# Altium PCB photo_frame-v1.0.PcbDoc (part 3 of 5)
Units mil, origin at the board's own origin, x right, y up, seen from the top; angles counter-clockwise.
Board outline 27716.54 x 14566.93 mil, 2 copper layers (Top Layer, Bottom Layer), stack 61.811 mil thick; 261 components, 231 nets, 1061 pads, 959 vias.
Unrouted connection lines stored in the file: 10.
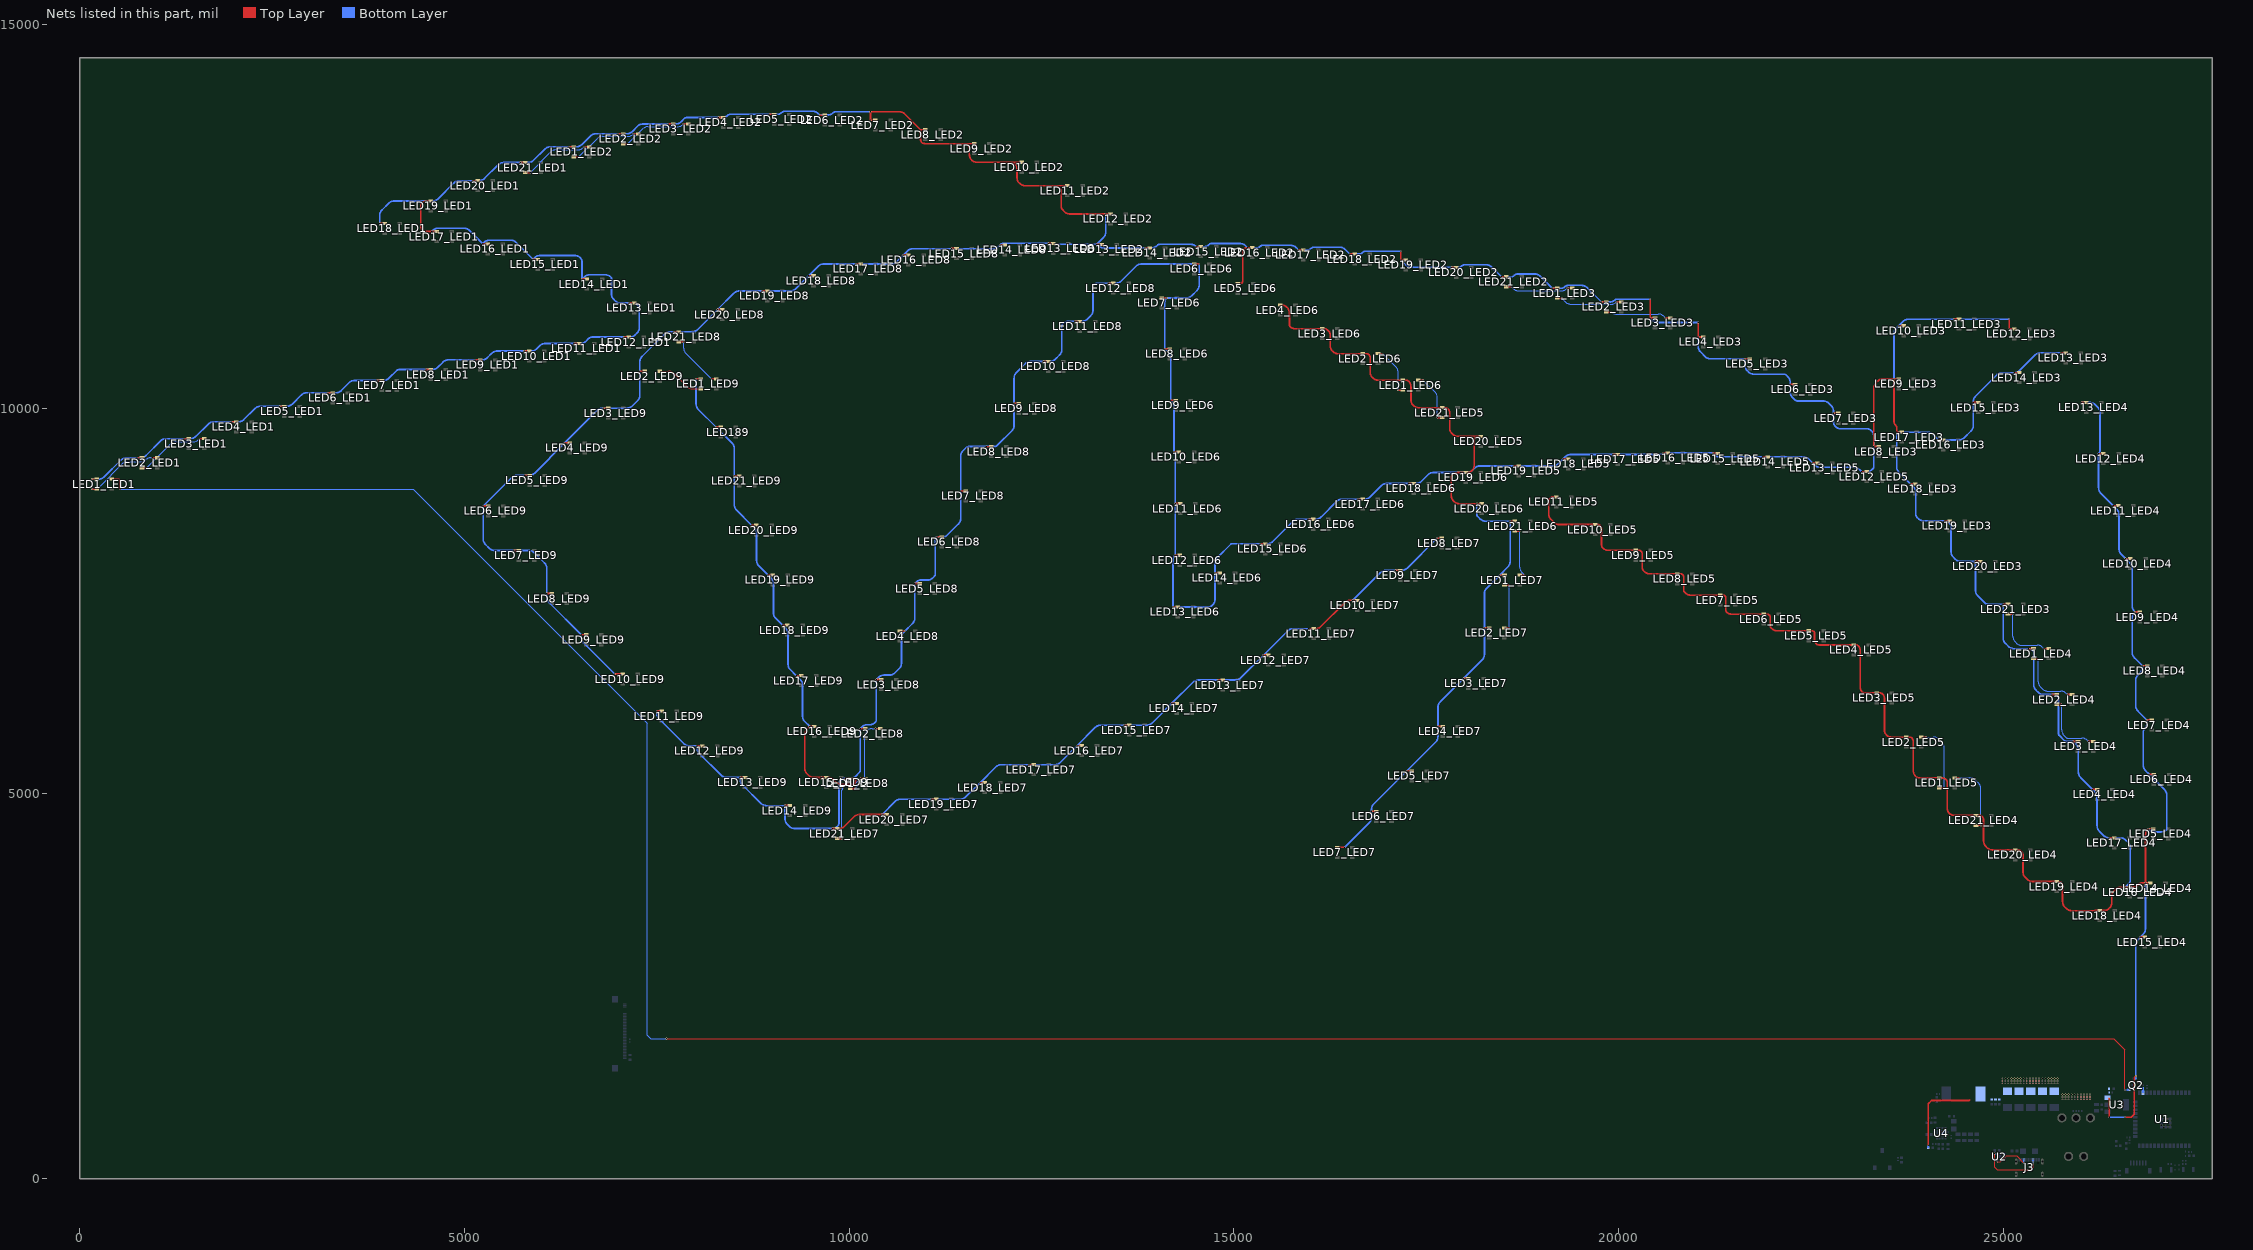
[diagram p2: the nets of this part, all layers, seen from the top]

## Via types
v1: diameter 23.62, hole 11.81, Top Layer to Bottom Layer, tented both sides, 729 vias
v2: diameter 23.62, hole 11.81, Top Layer to Bottom Layer, 230 vias

## Nets (pads, with @x,y where several pads share a name; then routed paths per layer and width w, separated by ;. In a path a pad name is that pad's centre, name@x,y a point inside that pad or via, vN(x,y) a via of type N, cw(c..) or ccw(c..) an arc to the next point about the centre after c; other vN are vias at no path point) (continued)
5V: C9.2 C10.2 C20.1 C21.1 C22.1 C23.1 C24.1 C25.2 C26.2 C27.2 L1.2 LED1_LED1.1 LED1_LED2.1 LED1_LED3.1 LED1_LED4.1 LED1_LED5.1 LED1_LED6.1 LED1_LED7.1 LED1_LED8.1 LED1_LED9.1 LED2_LED1.1 LED2_LED2.1 LED2_LED3.1 LED2_LED4.1 LED2_LED5.1 LED2_LED6.1 LED2_LED7.1 LED2_LED8.1 LED2_LED9.1 LED3_LED1.1 LED3_LED2.1 LED3_LED3.1 LED3_LED4.1 LED3_LED5.1 LED3_LED6.1 LED3_LED7.1 LED3_LED8.1 LED3_LED9.1 LED4_LED1.1 LED4_LED2.1 LED4_LED3.1 LED4_LED4.1 LED4_LED5.1 LED4_LED6.1 LED4_LED7.1 LED4_LED8.1 LED4_LED9.1 LED5_LED1.1 LED5_LED2.1 LED5_LED3.1 LED5_LED4.1 LED5_LED5.1 LED5_LED6.1 LED5_LED7.1 LED5_LED8.1 LED5_LED9.1 LED6_LED1.1 LED6_LED2.1 LED6_LED3.1 LED6_LED4.1 LED6_LED5.1 LED6_LED6.1 LED6_LED7.1 LED6_LED8.1 LED6_LED9.1 LED7_LED1.1 LED7_LED2.1 LED7_LED3.1 LED7_LED4.1 LED7_LED5.1 LED7_LED6.1 LED7_LED7.1 LED7_LED8.1 LED7_LED9.1 LED8_LED1.1 LED8_LED2.1 LED8_LED3.1 LED8_LED4.1 LED8_LED5.1 LED8_LED6.1 LED8_LED7.1 LED8_LED8.1 LED8_LED9.1 LED9_LED1.1 LED9_LED2.1 LED9_LED3.1 LED9_LED4.1 LED9_LED5.1 LED9_LED6.1 LED9_LED7.1 LED9_LED8.1 LED9_LED9.1 LED10_LED1.1 LED10_LED2.1 LED10_LED3.1 LED10_LED4.1 LED10_LED5.1 LED10_LED6.1 LED10_LED7.1 LED10_LED8.1 LED10_LED9.1 LED11_LED1.1 LED11_LED2.1 LED11_LED3.1 LED11_LED4.1 LED11_LED5.1 LED11_LED6.1 LED11_LED7.1 LED11_LED8.1 LED11_LED9.1 LED12_LED1.1 LED12_LED2.1 LED12_LED3.1 LED12_LED4.1 LED12_LED5.1 LED12_LED6.1 LED12_LED7.1 LED12_LED8.1 LED12_LED9.1 LED13_LED1.1 LED13_LED2.1 LED13_LED3.1 LED13_LED4.1 LED13_LED5.1 LED13_LED6.1 LED13_LED7.1 LED13_LED8.1 LED13_LED9.1 LED14_LED1.1 LED14_LED2.1 LED14_LED3.1 LED14_LED4.1 LED14_LED5.1 LED14_LED6.1 LED14_LED7.1 LED14_LED8.1 LED14_LED9.1 LED15_LED1.1 LED15_LED2.1 LED15_LED3.1 LED15_LED4.1 LED15_LED5.1 LED15_LED6.1 LED15_LED7.1 LED15_LED8.1 LED15_LED9.1 LED16_LED1.1 LED16_LED2.1 LED16_LED3.1 LED16_LED4.1 LED16_LED5.1 LED16_LED6.1 LED16_LED7.1 LED16_LED8.1 LED16_LED9.1 LED17_LED1.1 LED17_LED2.1 LED17_LED3.1 LED17_LED4.1 LED17_LED5.1 LED17_LED6.1 LED17_LED7.1 LED17_LED8.1 LED17_LED9.1 LED18_LED1.1 LED18_LED2.1 LED18_LED3.1 LED18_LED4.1 LED18_LED5.1 LED18_LED6.1 LED18_LED7.1 LED18_LED8.1 LED18_LED9.1 LED19_LED1.1 LED19_LED2.1 LED19_LED3.1 LED19_LED4.1 LED19_LED5.1 LED19_LED6.1 LED19_LED7.1 LED19_LED8.1 LED19_LED9.1 LED20_LED1.1 LED20_LED2.1 LED20_LED3.1 LED20_LED4.1 LED20_LED5.1 LED20_LED6.1 LED20_LED7.1 LED20_LED8.1 LED20_LED9.1 LED21_LED1.1 LED21_LED2.1 LED21_LED3.1 LED21_LED4.1 LED21_LED5.1 LED21_LED6.1 LED21_LED7.1 LED21_LED8.1 LED21_LED9.1 LED189.1 R6.2 R14.2 U3.3 U4.24 | length 155545.7
  Top Layer w22: v1@161.12,9088.39 LED1_LED1.1@223.94,9088.39 ; v1@748.87,9366.22 LED2_LED1.1@811.69,9366.22 ; v1@1358.08,9614.28 LED3_LED1.1@1420.9,9614.28 ; v1@1975.87,9833.22 LED4_LED1.1@2038.69,9833.22 ; v1@2599.87,10034.22 LED5_LED1.1@2662.69,10034.22 ; v1@3226.87,10210.22 LED6_LED1.1@3289.69,10210.22 ; v1@3864.87,10370.22 LED7_LED1.1@3927.69,10370.22 ; v1@3900.54,12412.97 LED18_LED1.1@3963.36,12412.97 ; v1@4499.87,10512.22 LED8_LED1.1@4562.69,10512.22 ; LED19_LED1.1@4564.68,12703.19 4564.62,12703.13 4501.92,12703.13 v1(4501.86,12703.07) ccw(c4501.86,12635.99) 4454.43,12683.43 4453,12682 ccw(c4496.46,12638.54) 4435,12638.54 4435,12374.11 ccw(c4510.11,12374.11) 4457,12321 ccw(c4493.92,12357.92) 4493.92,12305.71 v1(4577.02,12305.71) ; v1@4577.02,12305.84 LED17_LED1.1@4639.84,12305.84 ; v1@5112.15,12966.98 LED20_LED1.1@5174.97,12966.98 ; v1@5142.42,10638.9 LED9_LED1.1@5205.24,10638.9 ; v1@5238.98,12146.73 LED16_LED1.1@5301.8,12146.73 ; v1@5245.87,8740.22 LED6_LED9.1@5308.69,8740.22 ; v1@5646.87,8161.22 LED7_LED9.1@5709.69,8161.22 ; v1@5730.87,13202.22 LED21_LED1.1@5793.69,13202.22 ; v1@5781.87,10753.22 LED10_LED1.1@5844.69,10753.22 ; v1@5785.87,9137.22 LED5_LED9.1@5848.69,9137.22 ; v1@5892.26,11944.12 LED15_LED1.1@5955.08,11944.12 ; v1@6071.87,7602.22 LED8_LED9.1@6134.69,7602.22 ; v1@6305.87,9559.22 LED4_LED9.1@6368.69,9559.22 ; v1@6361.87,13406.22 LED1_LED2.1@6424.69,13406.22 ; v1@6427.87,10851.22 LED11_LED1.1@6490.69,10851.22 ; v1@6519.87,7066.22 LED9_LED9.1@6582.69,7066.22 ; v1@6530,11687.93 LED14_LED1.1@6592.82,11687.93 ; v1@6806.87,10011.22 LED3_LED9.1@6869.69,10011.22 ; v1(6954.08,6555.22) LED10_LED9.1@7057.69,6555.22 ; v1@7000.87,13575.22 LED2_LED2.1@7063.69,13575.22 ; v1(7074.17,10935.07) LED12_LED1.1@7136.96,10935.04 ; v1@7144.52,11377.91 LED13_LED1.1@7207.34,11377.91 ; v1@7279.87,10490.22 LED2_LED9.1@7342.69,10490.22 ; v1@7500.87,6074.22 LED11_LED9.1@7563.69,6074.22 ; v1@7650.87,13703.22 LED3_LED2.1@7713.69,13703.22 ; v1@7723.87,11002.22 LED21_LED8.1@7786.69,11002.22 ; v1@8011.87,10391.22 LED1_LED9.1@8074.69,10391.22 ; v1@8026.87,5623.22 LED12_LED9.1@8089.69,5623.22 ; v1@8269.87,9765.22 LED189.1@8332.69,9765.22 ; v1@8290.87,11292.22 LED20_LED8.1@8353.69,11292.22 ; v1@8302.87,13788.22 LED4_LED2.1@8365.69,13788.22 ; v1@8508.87,9131.22 LED21_LED9.1@8571.69,9131.22 ; v1@8584.87,5212.22 LED13_LED9.1@8647.69,5212.22 ; v1@8732.87,8490.22 LED20_LED9.1@8795.69,8490.22 ; v1@8873.87,11533.22 LED19_LED8.1@8936.69,11533.22 ; v1@8943.87,7844.22 LED19_LED9.1@9006.69,7844.22 ; v1@8961.87,13829.22 LED5_LED2.1@9024.69,13829.22 ; v1@9135.87,7190.22 LED18_LED9.1@9198.69,7190.22 ; v1@9167.87,4846.22 LED14_LED9.1@9230.69,4846.22 ; v1@9315.45,6534.26 LED17_LED9.1@9378.27,6534.26 ; v1@9474.87,11731.22 LED18_LED8.1@9537.69,11731.22 ; v1(9487.16,5875.77) 9453.29,5841.9 ccw(c9524,5771.19) 9424,5771.19 9424,5331.42 ccw(c9524,5331.42) 9453.29,5260.71 9473.12,5240.88 ccw(c9543.83,5311.59) 9543.83,5211.59 v1(9638.53,5211.59) ; v1@9487.16,5875.91 LED16_LED9.1@9549.98,5875.91 ; v1(9619.87,13820.07) 9620.31,13820.07 9622.16,13818.22 LED6_LED2.1@9682.69,13818.22 ; v1@9638.53,5211.73 LED15_LED9.1@9701.35,5211.73 9731.37,5211.73 cw(c9731.37,5119.3) 9796.73,5184.66 9830.09,5151.29 ccw(c9900.81,5222) 9900.81,5122 10046.86,5122 ccw(c10046.86,5156.14) 10071,5132 10073.81,5134.81 ccw(c10051.62,5157) 10083,5157 10083,5172.1 ccw(c10059.1,5172.1) 10076,5189 ccw(c10051.33,5164.33) 10051.33,5199.22 LED1_LED8.1@10015.69,5199.22 v1@9952.87,5199.22 ; v1@9782.07,4548.53 LED21_LED7.1@9844.89,4548.53 9870.1,4548.53 ccw(c9870.1,4648.53) 9940.81,4577.81 10063.8,4700.8 cw(c10134.51,4630.09) 10134.51,4730.09 v1(10428.87,4730.09) ; v1@10088.87,11884.22 LED17_LED8.1@10151.69,11884.22 ; v1@10145.87,5846.22 LED2_LED8.1@10208.69,5846.22 ; v1(10278.87,13753.09) v1@10278.87,13753.22 ; LED7_LED2.1@10341.69,13753.22 v1@10278.87,13753.22 ; v1@10354.87,6484.22 LED3_LED8.1@10417.69,6484.22 ; v1@10428.87,4730.22 LED20_LED7.1@10491.69,4730.22 ; LED4_LED8.1@10661.69,7113.22 v1@10724.51,7113.22 ; v1@10708.3,12002.18 LED16_LED8.1@10771.12,12002.18 ; v1@10853.87,7731.22 LED5_LED8.1@10916.69,7731.22 ; 10927.22,13630.22 LED8_LED2.1@10991.69,13630.22 ; v1@11068.87,4930.22 LED19_LED7.1@11131.69,4930.22 ; v1@11140.87,8339.22 LED6_LED8.1@11203.69,8339.22 ; v1@11332.87,12084.22 LED15_LED8.1@11395.69,12084.22 ; v1@11450.87,8934.22 LED7_LED8.1@11513.69,8934.22 ; 11563,13295 11563,13370.67 ccw(c11463,13370.67) 11533.71,13441.38 11527,13448.09 ; 11563.87,13304.55 ccw(c11663.87,13304.55) 11593.16,13233.84 11594,13233 ccw(c11658.97,13297.97) 11658.97,13206.09 12134,13206.09 ; 11563.87,13448.09 11527,13448.09 ; 11563.87,13448.22 LED9_LED2.1@11626.69,13448.22 ; v1@11702.87,5144.22 LED18_LED7.1@11765.69,5144.22 ; v1@11782.87,9511.22 LED8_LED8.1@11845.69,9511.22 ; v1@11960.87,12133.22 LED14_LED8.1@12023.69,12133.22 ; v1@12143.87,10074.22 LED9_LED8.1@12206.69,10074.22 ; 12181.87,13206.09 12134,13206.09 ; 12181.87,13206.22 LED10_LED2.1@12244.69,13206.22 ; v1@12335.87,5377.22 LED17_LED7.1@12398.69,5377.22 ; v1@12524.87,10617.22 LED10_LED8.1@12587.69,10617.22 ; v1@12590.45,12152.26 LED13_LED8.1@12653.27,12152.26 ; 12774.87,12902.09 12704,12902.09 ; 12774.87,12902.22 LED11_LED2.1@12837.69,12902.22 ; v1@12936.87,11138.22 LED11_LED8.1@12999.69,11138.22 ; v1@12961.87,5624.22 LED16_LED7.1@13024.69,5624.22 ; v1@13218.87,12139.22 LED13_LED2.1@13281.69,12139.22 ; v1(13333.87,12534.09) 12869.33,12534.09 cw(c12869.33,12634.09) 12798.62,12563.38 12775,12587 cw(c12816.04,12628.04) 12758,12628.04 12758,12825 ccw(c12702.26,12825) 12741.68,12864.41 12704,12902.09 ; v1@13333.87,12534.22 LED12_LED2.1@13396.69,12534.22 ; v1@13371.87,11634.22 LED12_LED8.1@13434.69,11634.22 ; v1@13579.87,5892.22 LED15_LED7.1@13642.69,5892.22 ; v1@13845.45,12093.18 LED14_LED2.1@13908.27,12093.18 ; LED7_LED6.1@14062.91,11442.37 v1@14125.73,11442.37 ; v1@14103.87,10780.22 LED8_LED6.1@14166.69,10780.22 ; v1@14179.45,10113.18 LED9_LED6.1@14242.27,10113.18 ; v1@14194.87,6174.22 LED14_LED7.1@14257.69,6174.22 ; v1@14209.87,7428.22 LED13_LED6.1@14272.69,7428.22 ; v1@14222.87,9443.22 LED10_LED6.1@14285.69,9443.22 ; v1@14233.45,8099.26 LED12_LED6.1@14296.27,8099.26 ; v1@14239.87,8771.22 LED11_LED6.1@14302.69,8771.22 ; LED6_LED6.1@14486.82,11884.4 v1@14549.64,11884.4 ; v1@14509.84,12108.72 LED15_LED2.1@14572.66,12108.72 ; v1@14754.87,7869.22 LED14_LED6.1@14817.69,7869.22 ; v1@14794.3,6478.18 LED13_LED7.1@14857.12,6478.18 ; LED5_LED6.1@15053.08,11632.48 15101.67,11632.48 ccw(c15069.5,11664.66) 15115,11664.66 15115,12055.51 cw(c15135.49,12055.51) 15121,12070 15126.24,12075.24 cw(c15176.58,12024.91) v1(15176.58,12096.09) ; v1@15176.58,12096.23 LED16_LED2.1@15239.4,12096.23 ; v1@15344.87,8248.22 LED15_LED6.1@15407.69,8248.22 ; v1@15385.87,6802.22 LED12_LED7.1@15448.69,6802.22 ; LED4_LED6.1@15604,11349.47 15625.52,11349.47 cw(c15625.52,11262.52) 15687,11324 15692.71,11318.29 cw(c15622,11247.58) 15722,11247.58 15722,11100.17 ccw(c15774.19,11100.17) 15737.28,11063.27 ccw(c15796.75,11143.67) 15796.75,11043.67 LED3_LED6.1@16146.99,11043.67 16167.03,11043.67 cw(c16167.03,10956.03) 16229,11018 cw(c16175.89,10964.89) 16251,10964.89 16251,10824.42 ccw(c16351,10824.42) 16280.29,10753.71 16288,10746 ccw(c16355.54,10813.54) 16355.54,10718.02 LED2_LED6.1@16676.02,10718.02 16721.73,10718.02 cw(c16721.73,10666.73) 16758,10703 cw(c16724.2,10669.2) 16772,10669.2 16772,10477.42 ccw(c16872,10477.42) 16801.29,10406.71 16803.57,10404.43 ccw(c16874.28,10475.15) 16874.28,10375.15 LED1_LED6.1@17197.04,10375.15 17235.85,10375.15 cw(c17235.85,10326.85) 17270,10361 17271.71,10359.29 cw(c17201,10288.58) 17301,10288.58 17301,10113.77 ccw(c17389.77,10113.77) 17327,10051 17331.71,10046.29 ccw(c17402.42,10117) 17402.42,10017 LED21_LED5.1@17708.98,10017 17738.71,10017 cw(c17738.71,9948.71) 17787,9997 cw(c17745.96,9955.96) 17804,9955.96 17804,9749.18 ccw(c17896.18,9749.18) 17831,9684 17841.32,9673.68 ccw(c17912.03,9744.39) 17912.03,9644.39 18148.3,9644.39 ccw(c18209.37,9583.32) 18123,9583.32 18123,9266.42 cw(c18023,9266.42) 18093.71,9195.71 18091,9193 cw(c18048.08,9235.92) 18048.08,9175.22 LED19_LED6.1@18010.69,9175.22 v1@17947.87,9175.22 ; v1@15839.66,12066.72 LED17_LED2.1@15902.48,12066.72 ; v1@15965.87,8567.22 LED16_LED6.1@16028.69,8567.22 ; v1@15972.87,7145.22 LED11_LED7.1@16035.69,7145.22 16067.59,7145.22 ccw(c16067.59,7226.41) 16125,7169 16439.8,7483.8 cw(c16510.51,7413.09) 16510.51,7513.09 v1(16542.87,7513.09) ; LED7_LED7.1@16341.69,4304.22 16439.78,4304.22 v1(16440,4304) ; v1@16505.27,12013.33 LED18_LED2.1@16568.09,12013.33 ; v1@16542.87,7513.22 LED10_LED7.1@16605.69,7513.22 ; v1@16611.87,8828.22 LED17_LED6.1@16674.69,8828.22 ; v1@16788.87,4772.22 LED6_LED7.1@16851.69,4772.22 ; v1@17098.87,7903.22 LED9_LED7.1@17161.69,7903.22 ; v1(17168.35,11937.85) v1(17168.35,12051) ; v1@17168.35,11937.99 LED19_LED2.1@17231.17,11937.99 ; v1@17248.87,5298.22 LED5_LED7.1@17311.69,5298.22 ; v1@17272.87,9032.22 LED18_LED6.1@17335.69,9032.22 ; v1@17639.87,8321.22 LED8_LED7.1@17702.69,8321.22 ; v1@17651.87,5876.22 LED4_LED7.1@17714.69,5876.22 ; v1@17827.98,11840.94 LED20_LED2.1@17890.8,11840.94 ; v1(17947.87,9175.09) 17912.51,9175.09 ccw(c17912.51,9075.09) 17841.8,9145.8 17839,9143 ccw(c17872.8,9109.2) 17825,9109.2 17825,8875.42 ccw(c17925,8875.42) 17854.29,8804.71 17866,8793 ccw(c17921.32,8848.32) 17921.32,8770.09 v1(18157.87,8770.09) ; v1@17985.87,6499.22 LED3_LED7.1@18048.69,6499.22 ; 18148.3,9644.26 LED20_LED5.1@18211.12,9644.26 ; v1@18157.87,8770.22 LED20_LED6.1@18220.69,8770.22 ; v1@18255.87,7156.22 LED2_LED7.1@18318.69,7156.22 ; v1@18453.87,7840.22 LED1_LED7.1@18516.69,7840.22 ; v1@18478.45,11718.18 LED21_LED2.1@18541.27,11718.18 ; v1@18589.87,8542.22 LED21_LED6.1@18652.69,8542.22 ; v1@18638.01,9260.08 LED19_LED5.1@18700.83,9260.08 ; v1@19136.87,11570.22 LED1_LED3.1@19199.69,11570.22 ; LED11_LED5.1@19186.69,8859.22 19149.08,8859.22 ccw(c19149.08,8804.04) 19110.06,8843.06 19104,8837 ccw(c19135.38,8805.62) 19091,8805.62 19091,8636.42 ccw(c19191,8636.42) 19120.29,8565.71 19158.62,8527.38 ccw(c19229.33,8598.09) 19229.33,8498.09 19630.87,8498.09 ; v1@19279.64,9352.67 LED18_LED5.1@19342.46,9352.67 ; 19630.87,8498.22 LED10_LED5.1@19693.69,8498.22 19725.89,8498.22 cw(c19725.89,8439.58) 19759.06,8487.94 ; 19759,8488 cw(c19713.13,8442.13) 19759.06,8487.94 ; v1@19776.87,11391.22 LED2_LED3.1@19839.69,11391.22 ; v1@19928.56,9408.7 LED17_LED5.1@19991.38,9408.7 ; v1(20409.87,11183.09) v1@20410,11183.21 ; v1(20410,11427) v1@20410,11183.22 ; LED3_LED3.1@20472.69,11183.22 v1@20410,11183.22 ; v1@20575.52,9430.82 LED16_LED5.1@20638.34,9430.82 ; 20698.87,7857.09 20406.33,7857.09 cw(c20406.33,7957.09) 20335.62,7886.38 20323,7899 cw(c20361.63,7937.63) 20307,7937.63 20307,8115.2 ccw(c20259.2,8115.2) 20293,8149 ccw(c20256.25,8112.25) 20256.25,8164.22 LED9_LED5.1@20219.69,8164.22 19865.2,8164.22 cw(c19865.2,8264.22) 19794.49,8193.51 19792,8196 cw(c19825.8,8229.8) 19778,8229.8 19778,8442.13 ccw(c19713.13,8442.13) 19777.66,8448.79 ccw(c19713.13,8442.13) 19759.06,8487.94 ; 20698.87,7857.22 LED8_LED5.1@20761.69,7857.22 20807.26,7857.22 cw(c20807.26,7822.17) 20832.05,7846.95 cw(c20800.77,7815.68) 20845,7815.68 20845,7654.46 ccw(c20906.46,7654.46) 20863,7611 20863.62,7610.38 ccw(c20934.33,7681.09) 20934.33,7581.09 21255.87,7581.09 ; v1(21033.87,10936.09) v1@21033.87,10936.22 ; v1(21033.87,11125) v1@21033.87,10936.22 ; LED4_LED3.1@21096.69,10936.22 v1@21033.87,10936.22 ; v1@21224.19,9421.22 LED15_LED5.1@21287.01,9421.22 ; 21255.87,7581.22 LED7_LED5.1@21318.69,7581.22 21360.15,7581.22 cw(c21360.15,7553.15) 21380,7573 cw(c21348.62,7541.62) 21393,7541.62 21393,7386.56 ccw(c21430.56,7386.56) 21404,7360 ccw(c21466.14,7422.14) 21466.14,7334.26 LED6_LED5.1@21885.12,7334.26 21923.75,7334.26 cw(c21923.75,7278.75) 21963,7318 cw(c21943.69,7298.69) 21971,7298.69 21971,7175.9 ccw(c21994.9,7175.9) 21978,7159 21989.62,7147.38 ccw(c22060.33,7218.09) 22060.33,7118.09 22404.87,7118.09 ; v1@21642.87,10651.22 LED5_LED3.1@21705.69,10651.22 ; v1@21872.13,9379.01 LED14_LED5.1@21934.95,9379.01 ; v1@22228.94,10320.59 LED6_LED3.1@22291.76,10320.59 ; 22404.87,7118.22 LED5_LED5.1@22467.69,7118.22 22508.08,7118.22 cw(c22508.08,7073.08) 22540,7105 cw(c22527.93,7092.93) 22545,7092.93 22545,7008.77 ccw(c22633.77,7008.77) 22571,6946 ccw(c22599.76,6974.76) 22599.76,6934.09 22989.87,6934.09 ; v1@22518.15,9300.01 LED13_LED5.1@22580.97,9300.01 ; v1@22791.49,9944.43 LED7_LED3.1@22854.31,9944.43 ; 22989.87,6934.22 LED4_LED5.1@23052.69,6934.22 23082.67,6934.22 cw(c23082.67,6885.67) 23117,6920 cw(c23066.3,6869.3) 23138,6869.3 23138,6391.42 ccw(c23238,6391.42) 23167.29,6320.71 23168,6320 ccw(c23189.52,6341.52) 23189.52,6311.09 23290.87,6311.09 ; v1@23158.45,9185.26 LED12_LED5.1@23221.27,9185.26 ; 23290.87,6311.22 LED3_LED5.1@23353.69,6311.22 23388.01,6311.22 cw(c23388.01,6249.01) 23432,6293 cw(c23378.89,6239.89) 23454,6239.89 23454,5828.6 ccw(c23549.6,5828.6) 23482,5761 ccw(c23542.15,5821.15) 23542.15,5736.09 23671.87,5736.09 ; v1(23314.84,9511.28) v1@23314.84,9511.41 ; LED8_LED3.1@23377.66,9511.41 v1@23314.84,9511.41 ; v1@23577.45,10391.11 LED9_LED3.1@23640.27,10391.11 ; v1(23613.94,9698.81) v1@23613.94,9698.94 ; v1@23641.06,11081.68 LED10_LED3.1@23703.88,11081.68 ; 23671.87,5736.22 LED2_LED5.1@23734.69,5736.22 23785.74,5736.22 cw(c23785.74,5704.74) 23808,5727 cw(c23757.3,5676.3) 23829,5676.3 23829,5298.42 ccw(c23929,5298.42) 23858.29,5227.71 23864,5222 ccw(c23901.56,5259.56) 23901.56,5206.44 LED1_LED5.1@24168.37,5206.44 24198.99,5206.44 cw(c24198.99,5122.99) 24258,5182 cw(c24231.44,5155.44) 24269,5155.44 24269,4816.42 ccw(c24369,4816.42) 24298.29,4745.71 24302,4742 ccw(c24357.93,4797.93) 24357.93,4718.83 24581.18,4718.83 ; LED17_LED3.1@23676.76,9698.94 v1@23613.94,9698.94 ; v1@23790.63,9027.89 LED18_LED3.1@23853.45,9027.89 ; v1(24023.12,433.12) 24023.12,972.12 24065,1014 24555,1014 24561,1020 ; v1@24153.46,9598.12 LED16_LED3.1@24216.28,9598.12 ; v1@24238.51,8547.17 LED19_LED3.1@24301.33,8547.17 ; v1@24359.86,11168.1 LED11_LED3.1@24422.68,11168.1 ; 24581.18,4718.97 LED21_LED4.1@24644,4718.97 24690.7,4718.97 cw(c24690.7,4674.7) 24722,4706 cw(c24672.7,4656.7) 24742.42,4656.7 24742.42,4385 ccw(c24840,4385) 24771,4316 24787.61,4299.39 ccw(c24858.32,4370.1) 24858.32,4270.1 25091.95,4270.1 ; v1@24608.43,10083.2 LED15_LED3.1@24671.25,10083.2 ; v1@24637.11,8018.87 LED20_LED3.1@24699.93,8018.87 ; v1@24997.03,7462.96 LED21_LED3.1@25059.85,7462.96 ; v1(25076.98,11041.79) v1(25076.98,11168) ; v1@25076.98,11041.92 LED12_LED3.1@25139.8,11041.92 ; 25091.95,4270.24 LED20_LED4.1@25154.77,4270.24 25197.63,4270.24 cw(c25197.63,4221.63) 25232,4256 cw(c25178.89,4202.89) 25254,4202.89 25254,3984.42 ccw(c25354,3984.42) 25283.29,3913.71 25308.8,3888.2 ccw(c25379.51,3958.91) 25379.51,3858.91 LED19_LED4.1@25695.21,3858.91 25716.88,3858.91 cw(c25716.88,3804.03) 25755.68,3842.84 cw(c25687.06,3798.06) 25769,3798.06 25769,3598.42 ccw(c25869,3598.42) 25798.29,3527.71 25814.97,3511.03 ccw(c25885.68,3581.75) 25885.68,3481.75 26189.89,3481.75 ; v1@25144.32,10471.21 LED14_LED3.1@25207.14,10471.21 ; v1@25328.31,6885.36 LED1_LED4.1@25391.13,6885.36 ; v1@25631.75,6289.12 LED2_LED4.1@25694.57,6289.12 ; v1@25744.87,10729.14 LED13_LED3.1@25807.69,10729.14 ; v1@25906.23,5680.24 LED3_LED4.1@25969.05,5680.24 ; v1@26011.15,10084.56 LED13_LED4.1@26073.97,10084.56 ; v1@26155.32,5057.42 LED4_LED4.1@26218.14,5057.42 ; 26189.89,3481.88 LED18_LED4.1@26252.71,3481.88 26314.31,3481.88 ccw(c26314.31,3554.36) 26365.52,3503.07 ; v1@26236.56,9418.78 LED12_LED4.1@26299.38,9418.78 ; 26365.56,3503.11 26379.71,3517.26 ccw(c26309,3587.97) 26409,3587.97 26409,3667.58 cw(c26509,3667.58) 26438.29,3738.29 26457.57,3757.57 cw(c26528.28,3686.86) 26528.28,3786.86 v1(26581.8,3786.86) ; 26373,1042 26376,1039 v1(26376,796) ; v1@26378.73,4427.36 LED17_LED4.1@26441.55,4427.36 ; v1@26426.87,8743.34 LED11_LED4.1@26489.69,8743.34 ; v1(26580,796) 26663,796 26702,835 26702,1313.14 v1(26721.12,1332.26) ; v1@26581.8,3786.99 LED16_LED4.1@26644.62,3786.99 26680.57,3786.99 ccw(c26680.57,3886.99) 26751.28,3816.28 26760,3825 cw(c26795.35,3789.65) 26795.35,3839.64 v1(26846.29,3839.64) v1@26846.29,3839.78 ; v1@26587.51,8055.35 LED10_LED4.1@26650.33,8055.35 ; v1@26711.74,7361.46 LED9_LED4.1@26774.56,7361.46 ; v1@26779.18,3139 LED15_LED4.1@26842,3139 ; v1@26807.06,6661.54 LED8_LED4.1@26869.88,6661.54 ; v1@26865.3,5957.47 LED7_LED4.1@26928.12,5957.47 ; v1(26884.14,4544.17) 26875.58,4535.6 ccw(c26946.29,4464.89) 26846.29,4464.89 v1@26846.29,3839.78 ; v1@26884.14,4544.3 LED5_LED4.1@26946.96,4544.3 ; v1@26893.39,5251.67 LED6_LED4.1@26956.21,5251.67 ; LED14_LED4.1@26909.11,3839.78 v1@26846.29,3839.78 ; v1@10278.87,13753.22 v1(10278.87,13862) 10655.54,13862 cw(c10655.54,13765.99) 10723.43,13833.88 10927.22,13630.09 10927.22,13513.5 ccw(c11007.56,13513.5) 10950.75,13456.69 ccw(c10991.33,13548.09) 10991.33,13448.09 11527,13448.09 ; 12134,13206.09 12152.58,13187.5 cw(c12081.87,13116.79) 12181.87,13116.79 12181.87,13006.32 ccw(c12281.32,13006.32) 12211,12936 12215.62,12931.38 ccw(c12286.33,13002.09) 12286.33,12902.09 12704,12902.09 ; v1@23314.84,9511.41 23314.84,10267.42 cw(c23414.84,10267.42) 23344.13,10338.13 23373,10367 cw(c23430.89,10309.11) 23430.89,10390.98 v1(23577.45,10390.98) 23577.45,9839.2 ccw(c23644.2,9839.2) 23597,9792 cw(c23556.11,9751.11) 23613.94,9751.11 v1@23613.94,9698.94
  Bottom Layer w22: v1(161.12,9088.26) 249.84,9088.26 ccw(c249.84,9188.26) 320.55,9117.55 539.8,9336.8 cw(c610.51,9266.09) 610.51,9366.09 v1(748.87,9366.09) 793.67,9366.09 ccw(c793.67,9466.09) 864.38,9395.38 1055,9586 cw(c1122.94,9518.06) 1122.94,9614.14 v1(1358.08,9614.14) 1439.72,9614.14 ccw(c1439.72,9714.14) 1510.43,9643.43 1670.8,9803.8 cw(c1741.51,9733.09) 1741.51,9833.09 v1(1975.87,9833.09) 2063.67,9833.09 ccw(c2063.67,9933.09) 2134.38,9862.38 2276.8,10004.8 cw(c2347.51,9934.09) 2347.51,10034.09 v1(2599.87,10034.09) 2691.67,10034.09 ccw(c2691.67,10134.09) 2762.38,10063.38 2879.8,10180.8 cw(c2950.51,10110.09) 2950.51,10210.09 v1(3226.87,10210.09) 3329.67,10210.09 ccw(c3329.67,10310.09) 3400.38,10239.38 3501.8,10340.8 cw(c3572.51,10270.09) 3572.51,10370.09 v1(3864.87,10370.09) 3948.67,10370.09 ccw(c3948.67,10470.09) 4019.38,10399.38 4118,10498 cw(c4152.01,10463.99) 4152.01,10512.09 v1(4499.87,10512.09) 4583.67,10512.09 ccw(c4583.67,10612.09) 4654.38,10541.38 4722.47,10609.47 cw(c4793.19,10538.76) 4793.19,10638.76 v1(5142.42,10638.76) 5231.34,10638.76 ccw(c5231.34,10738.76) 5302.05,10668.05 5357.8,10723.8 cw(c5428.51,10653.09) 5428.51,10753.09 v1(5781.87,10753.09) 5870.67,10753.09 ccw(c5870.67,10853.09) 5941.38,10782.38 5980.8,10821.8 cw(c6051.51,10751.09) 6051.51,10851.09 v1(6427.87,10851.09) 6509.67,10851.09 ccw(c6509.67,10951.09) 6580.38,10880.38 6612,10912 cw(c6667.7,10856.3) 6667.7,10935.07 v1(7074.17,10935.07) 7151.65,10935.07 ccw(c7151.65,11035.07) 7222.36,10964.36 7244.71,10986.71 ccw(c7174,11057.42) 7274,11057.42 7274,11288.58 ccw(c7174,11288.58) 7244.71,11359.29 7237,11367 ccw(c7210.99,11340.99) 7210.99,11377.77 v1(7144.52,11377.77) 7029.65,11377.77 cw(c7029.65,11477.77) 6958.94,11407.06 6941.29,11424.71 cw(c7012,11495.42) 6912,11495.42 6912,11704.58 6901.87,11714.71 ccw(c6831.16,11644) 6831.16,11744 6627.63,11744 ccw(c6627.63,11644) 6556.92,11714.71 v1(6530,11687.8) 6530,11910.88 ccw(c6454.88,11910.88) 6508,11964 6506.29,11965.71 ccw(c6435.58,11895) 6435.58,11995 5984.69,11995 ccw(c5984.69,11895) 5913.98,11965.71 v1(5892.26,11943.99) 5667.19,12169.07 ccw(c5607,12108.88) 5607,12194 5327.8,12194 ccw(c5327.8,12094) 5257.09,12164.71 v1(5238.98,12146.6) 5064.87,12320.71 ccw(c4994.16,12250) 4994.16,12350 4662.74,12350 ccw(c4662.74,12250) 4592.03,12320.71 v1(4577.02,12305.71) ; v1(3900.54,12412.83) 3900.54,12515.12 cw(c4000.54,12515.12) 3929.83,12585.83 4017.78,12673.78 cw(c4088.49,12603.07) 4088.49,12703.07 v1(4501.86,12703.07) 4590.65,12703.07 ccw(c4590.65,12803.07) 4661.36,12732.36 4866.56,12937.56 cw(c4937.27,12866.85) 4937.27,12966.85 v1(5112.15,12966.85) 5192.43,12966.85 ccw(c5192.43,13066.85) 5263.14,12996.14 5439.8,13172.8 cw(c5510.51,13102.09) 5510.51,13202.09 v1(5730.87,13202.09) 5828.67,13202.09 ccw(c5828.67,13302.09) 5899.38,13231.38 6044.8,13376.8 cw(c6115.51,13306.09) 6115.51,13406.09 v1(6361.87,13406.09) 6453.67,13406.09 ccw(c6453.67,13506.09) 6524.38,13435.38 6634.8,13545.8 cw(c6705.51,13475.09) 6705.51,13575.09 v1(7000.87,13575.09) 7109.67,13575.09 ccw(c7109.67,13675.09) 7180.38,13604.38 7249.8,13673.8 cw(c7320.51,13603.09) 7320.51,13703.09 v1(7650.87,13703.09) 7746.67,13703.09 ccw(c7746.67,13803.09) 7817.38,13732.38 7862,13777 cw(c7888.77,13750.23) 7888.77,13788.09 v1(8302.87,13788.09) 8358.27,13788.09 ccw(c8358.27,13869.73) 8416,13812 cw(c8457.25,13770.75) 8457.25,13829.09 v1(8961.87,13829.09) 9066.85,13829.09 ccw(c9066.85,13914.15) 9127,13854 cw(c9160.8,13820.2) 9160.8,13868 9530.52,13868 cw(c9530.52,13768) 9601.23,13838.71 v1(9619.87,13820.07) 9723.57,13820.07 ccw(c9723.57,13915.43) 9791,13848 cw(c9824.8,13814.2) 9824.8,13862 v1@10277,13862 ; v1(6954.08,6555.22) 6549.16,6960.14 cw(c6619.87,7030.85) 6519.87,7030.85 v1(6519.87,7066.09) 6101.16,7484.8 cw(c6171.87,7555.51) 6071.87,7555.51 v1(6071.87,7602.09) 6071.87,7927.71 ccw(c5971.87,7927.71) 6042.58,7998.42 5909.2,8131.8 ccw(c5838.49,8061.09) 5838.49,8161.09 v1(5646.87,8161.09) 5395.33,8161.09 cw(c5395.33,8261.09) 5324.62,8190.38 5275.16,8239.84 cw(c5345.87,8310.55) 5245.87,8310.55 v1(5245.87,8740.09) 5613.58,9107.8 cw(c5684.29,9037.09) 5684.29,9137.09 v1(5785.87,9137.09) 5842.45,9137.09 ccw(c5842.45,9237.09) 5913.16,9166.38 v1(6305.87,9559.09) 6728.58,9981.8 cw(c6799.29,9911.09) 6799.29,10011.09 v1(6806.87,10011.09) 7114.67,10011.09 ccw(c7114.67,10111.09) 7185.38,10040.38 7250.58,10105.58 ccw(c7179.87,10176.29) 7279.87,10176.29 v1(7279.87,10490.09) 7279.87,10611.45 cw(c7379.87,10611.45) 7309.16,10682.16 7599.8,10972.8 cw(c7670.51,10902.09) 7670.51,11002.09 v1(7723.87,11002.09) 7959.45,11002.09 ccw(c7959.45,11102.09) 8030.16,11031.38 v1(8290.87,11292.09) 8502.58,11503.8 cw(c8573.29,11433.09) 8573.29,11533.09 v1(8873.87,11533.09) 9235.45,11533.09 ccw(c9235.45,11633.09) 9306.16,11562.38 v1(9474.87,11731.09) 9598.58,11854.8 cw(c9669.29,11784.09) 9669.29,11884.09 v1(10088.87,11884.09) 10548.92,11884.09 ccw(c10548.92,11984.09) 10619.63,11913.38 v1(10708.3,12002.05) 10761.05,12054.8 cw(c10831.76,11984.09) 10831.76,12084.09 v1(11332.87,12084.09) 11870.45,12084.09 ccw(c11870.45,12184.09) 11941.16,12113.38 v1(11960.87,12133.09) cw(c12006.84,12087.12) 12006.84,12152.13 v1(12590.45,12152.13) ccw(c12621.93,12183.61) 12621.93,12139.09 v1(13218.87,12139.09) ; v1(7500.87,6074.09) 7500.87,6045.55 ccw(c7600.87,6045.55) 7530.16,5974.84 7852.62,5652.38 ccw(c7923.33,5723.09) 7923.33,5623.09 v1(8026.87,5623.09) 8026.87,5592.55 ccw(c8126.87,5592.55) 8056.16,5521.84 8336.62,5241.38 ccw(c8407.33,5312.09) 8407.33,5212.09 v1(8584.87,5212.09) 8584.87,5184.55 ccw(c8684.87,5184.55) 8614.16,5113.84 8853,4875 ccw(c8922.8,4944.8) 8922.8,4846.09 v1(9167.87,4846.09) 9167.87,4672.55 ccw(c9267.87,4672.55) 9197.16,4601.84 9221.32,4577.68 ccw(c9292.03,4648.39) 9292.03,4548.39 v1(9782.07,4548.39) ccw(c9782.07,4643.33) 9849.2,4576.2 9856,4583 ccw(c9827.03,4611.97) 9868,4611.97 9868,5134.2 cw(c9915.8,5134.2) 9882,5168 9884.95,5170.95 cw(c9952.87,5103.04) v1(9952.87,5199.09) 10013.67,5199.09 ccw(c10013.67,5299.09) 10084.38,5228.38 10135,5279 ccw(c10108.75,5305.25) 10145.87,5305.25 v1(10145.87,5846.09) 10168.5,5868.71 cw(c10239.21,5798) 10239.21,5898 10270,5898 ccw(c10270,5989.74) 10334.87,5924.87 10343,5933 ccw(c10314.34,5961.66) 10354.87,5961.66 v1(10354.87,6484.09) 10383.5,6512.71 cw(c10454.21,6442) 10454.21,6542 10525.58,6542 ccw(c10525.58,6642) 10596.29,6571.29 10651.71,6626.71 ccw(c10581,6697.42) 10681,6697.42 10681,7028.42 cw(c10781,7028.42) 10710.29,7099.13 v1(10724.51,7113.35) 10824.58,7213.42 ccw(c10753.87,7284.14) 10853.87,7284.14 v1(10853.87,7731.35) 10873.23,7750.71 cw(c10943.94,7680) 10918.11,7776.61 11019.18,7776.61 ccw(c11019.18,7876.61) 11089.89,7805.89 11103,7819 ccw(c11061.96,7860.04) 11120,7860.04 11120,8288.96 cw(c11191.26,8288.96) v1(11140.87,8339.35) 11219.5,8339.35 ccw(c11219.5,8423.5) 11279,8364 11421.58,8506.58 ccw(c11350.87,8577.29) 11450.87,8577.29 v1(11450.87,8934.35) 11450.87,9387.45 cw(c11550.87,9387.45) 11480.16,9458.16 11521,9499 cw(c11550.83,9469.17) 11550.83,9511.35 v1(11782.87,9511.35) 11880.74,9511.35 ccw(c11880.74,9585.26) 11933,9533 12114.58,9714.58 ccw(c12043.87,9785.29) 12143.87,9785.29 v1(12143.87,10074.35) 12143.87,10400.45 cw(c12243.87,10400.45) 12173.16,10471.16 12293,10591 cw(c12356.62,10527.38) 12356.62,10617.35 v1(12524.87,10617.35) 12609.37,10617.35 ccw(c12609.37,10717.35) 12680.08,10646.64 12734.71,10701.28 ccw(c12664,10771.99) 12764,10771.99 12764,11075.49 cw(c12811.11,11075.49) 12777.8,11108.8 cw(c12848.51,11038.09) 12848.51,11138.09 v1(12936.87,11138.09) 13024.67,11138.09 ccw(c13024.67,11238.09) 13095.38,11167.38 13140.71,11212.71 ccw(c13070,11283.42) 13170,11283.42 13170,11594.1 cw(c13193.9,11594.1) 13177,11611 cw(c13232.74,11555.26) 13232.74,11634.09 v1(13371.87,11634.09) 13465.67,11634.09 ccw(c13465.67,11734.09) 13536.38,11663.38 13728.24,11855.24 cw(c13798.95,11784.53) 13798.95,11884.53 v1(14549.64,11884.53) 14549.64,11611.06 cw(c14449.64,11611.06) 14520.35,11540.35 14451.53,11471.53 cw(c14380.82,11542.24) 14380.82,11442.24 v1(14125.73,11442.24) ccw(c14178.5,11389.47) 14103.87,11389.47 v1(14103.87,10780.09) 14150.16,10733.8 cw(c14079.45,10663.09) 14179.45,10663.09 v1(14179.45,10113.05) 14193.58,10098.91 cw(c14122.87,10028.2) 14222.87,10028.2 v1(14222.87,9443.09) cw(c14181.83,9402.05) 14239.87,9402.05 v1(14239.87,8771.09) 14239.87,8114.64 cw(c14217.94,8114.64) v1(14233.45,8099.13) ccw(c14290.36,8042.21) 14209.87,8042.21 v1(14209.87,7428.09) 14665.27,7428.09 ccw(c14665.27,7509.73) 14723,7452 14725.58,7454.58 ccw(c14654.87,7525.29) 14754.87,7525.29 v1(14754.87,7869.09) 14754.87,7995.45 cw(c14854.87,7995.45) 14784.16,8066.16 14963,8245 cw(c14970.45,8237.55) 14970.45,8248.09 v1(15344.87,8248.09) 15434.67,8248.09 ccw(c15434.67,8348.09) 15505.38,8277.38 15765.8,8537.8 cw(c15836.51,8467.09) 15836.51,8567.09 v1(15965.87,8567.09) 16062.67,8567.09 ccw(c16062.67,8667.09) 16133.38,8596.38 16335.8,8798.8 cw(c16406.51,8728.09) 16406.51,8828.09 v1(16611.87,8828.09) 16699.67,8828.09 ccw(c16699.67,8928.09) 16770.38,8857.38 16915.8,9002.8 cw(c16986.51,8932.09) 16986.51,9032.09 v1(17272.87,9032.09) 17367.67,9032.09 ccw(c17367.67,9132.09) 17438.38,9061.38 17522.8,9145.8 cw(c17593.51,9075.09) 17593.51,9175.09 v1(17947.87,9175.09) 18030.67,9175.09 ccw(c18030.67,9275.09) 18101.38,9204.38 18127.66,9230.66 cw(c18198.37,9159.95) 18198.37,9259.95 v1(18638.01,9259.95) 19145.63,9259.95 ccw(c19145.63,9359.95) 19216.34,9289.24 v1(19279.64,9352.54) 19306.38,9379.28 cw(c19377.09,9308.57) 19377.09,9408.57 v1(19928.56,9408.57) 20522.11,9408.57 ccw(c20522.11,9484.1) v1(20575.52,9430.69) 21201,9430.69 cw(c21201,9397.91) v1(21224.19,9421.09) 21237.11,9408.17 ccw(c21307.82,9478.88) 21307.82,9378.88 v1(21872.13,9378.88) 22397.73,9378.88 cw(c22397.73,9278.88) 22468.44,9349.59 v1(22518.15,9299.87) 22547.74,9270.29 ccw(c22618.45,9341) 22618.45,9241 23061.15,9241 cw(c23061.15,9141) 23131.86,9211.71 v1(23158.45,9185.13) 23225.7,9185.13 ccw(c23225.7,9285.13) 23296.42,9214.42 23300,9218 ccw(c23264.18,9253.82) 23314.84,9253.82 v1(23314.84,9511.28) 23314.84,9646.74 ccw(c23214.84,9646.74) 23285.55,9717.45 23284,9719 ccw(c23228.47,9663.47) 23228.47,9742 22889.42,9742 cw(c22889.42,9842) 22818.71,9771.29 22813,9777 cw(c22864.92,9828.92) 22791.49,9828.92 v1(22791.49,9944.29) 22791.49,9973.09 ccw(c22691.49,9973.09) 22762.2,10043.8 22732.29,10073.71 ccw(c22661.58,10003) 22661.58,10103 22331.04,10103 cw(c22331.04,10161.04) 22290,10120 22258.23,10151.77 cw(c22328.94,10222.48) 22228.94,10222.48 v1(22228.94,10320.46) 22228.94,10348.64 ccw(c22128.94,10348.64) 22199.65,10419.35 22181,10438 ccw(c22147.2,10404.2) 22147.2,10452 21757.01,10452 cw(c21757.01,10551.01) 21687,10481 21672.16,10495.84 cw(c21742.87,10566.55) 21642.87,10566.55 v1(21642.87,10651.09) 21195.33,10651.09 cw(c21195.33,10751.09) 21124.62,10680.38 21063.16,10741.84 cw(c21133.87,10812.55) 21033.87,10812.55 v1(21033.87,10936.09) ; v1(8011.87,10391.09) 8011.87,10064.51 ccw(c8111.87,10064.51) 8041.16,9993.8 v1(8269.87,9765.09) 8479.58,9555.38 cw(c8408.87,9484.67) 8508.87,9484.67 v1(8508.87,9131.09) 8508.87,8755.51 ccw(c8608.87,8755.51) 8538.16,8684.8 v1(8732.87,8490.09) 8768.71,8454.25 cw(c8698,8383.54) 8798,8383.54 8798,8031.38 ccw(c8898,8031.38) 8827.29,7960.67 v1(8943.87,7844.09) 8988.74,7799.22 cw(c8920.53,7731) 9017,7731 9017,7350.38 ccw(c9117,7350.38) 9046.29,7279.67 v1(9135.87,7190.09) 9176.71,7149.25 cw(c9106,7078.54) 9206,7078.54 9206,6685 ccw(c9306,6685) 9235.29,6614.28 v1(9315.45,6534.13) 9365.71,6483.86 cw(c9295,6413.15) 9395,6413.15 9395,6009.36 ccw(c9495,6009.36) 9424.29,5938.65 v1(9487.16,5875.77) ; v1(10428.87,4730.09) 10599.58,4900.8 cw(c10670.29,4830.09) 10670.29,4930.09 v1(11068.87,4930.09) 11447.45,4930.09 ccw(c11447.45,5030.09) 11518.16,4959.38 v1(11702.87,5144.09) 11906.58,5347.8 cw(c11977.29,5277.09) 11977.29,5377.09 v1(12335.87,5377.09) 12673.45,5377.09 ccw(c12673.45,5477.09) 12744.16,5406.38 v1(12961.87,5624.09) 13200.58,5862.8 cw(c13271.29,5792.09) 13271.29,5892.09 v1(13579.87,5892.09) 13871.45,5892.09 ccw(c13871.45,5992.09) 13942.16,5921.38 v1(14194.87,6174.09) 14469.54,6448.76 cw(c14540.25,6378.05) 14540.25,6478.05 v1(14794.3,6478.05) 15020.41,6478.05 ccw(c15020.41,6578.05) 15091.12,6507.34 v1(15385.87,6802.09) 15699.58,7115.8 cw(c15770.29,7045.09) 15770.29,7145.09 v1(15972.87,7145.09) ; v1(13333.87,12534.09) 13333.87,12295.51 cw(c13233.87,12295.51) 13304.58,12224.8 v1(13218.87,12139.09) ; v1(16440,4304) 16759.58,4623.58 ccw(c16688.87,4694.29) 16788.87,4694.29 v1(16788.87,4772.09) 16788.87,4796.67 cw(c16888.87,4796.67) 16818.16,4867.38 v1(17248.87,5298.09) 17622.58,5671.8 ccw(c17551.87,5742.51) 17651.87,5742.51 v1(17651.87,5876.09) 17651.87,6123.67 cw(c17751.87,6123.67) 17681.16,6194.38 v1(17985.87,6499.09) 18226.58,6739.8 ccw(c18155.87,6810.51) 18255.87,6810.51 v1(18255.87,7156.09) 18255.87,7600.67 cw(c18355.87,7600.67) 18285.16,7671.38 v1(18453.87,7840.09) 18560.58,7946.8 ccw(c18489.87,8017.51) 18589.87,8017.51 v1(18589.87,8542.09) 18270.33,8542.09 cw(c18270.33,8642.09) 18199.62,8571.38 18168,8603 cw(c18192.45,8627.45) 18157.87,8627.45 v1(18157.87,8770.09) ; v1(16542.87,7513.09) 16903.58,7873.8 cw(c16974.29,7803.09) 16974.29,7903.09 v1(17098.87,7903.09) 17180.45,7903.09 ccw(c17180.45,8003.09) 17251.16,7932.38 v1(17639.87,8321.09) ; v1@17161,12051 cw(c17158.59,12053.41) v1@17158.59,12050 ; v1(17168.35,11937.85) 17236.11,11870.09 ccw(c17306.82,11940.8) 17306.82,11840.8 v1(17827.98,11840.8) 17924.14,11840.8 ccw(c17924.14,11885.86) 17956,11854 cw(c18001.87,11808.13) 18001.87,11873 18282.07,11873 cw(c18282.07,11773) 18352.78,11843.71 v1(18478.45,11718.05) 18601.66,11718.05 ccw(c18601.66,11779.34) 18645,11736 cw(c18690.87,11690.13) 18690.87,11755 18910.54,11755 cw(c18910.54,11655) 18981.25,11725.71 v1(19136.87,11570.09) 19258.17,11570.09 ccw(c19258.17,11627.83) 19299,11587 cw(c19344.87,11541.13) 19344.87,11606 19520.54,11606 cw(c19520.54,11506) 19591.25,11576.71 v1(19776.87,11391.09) 19896.34,11391.09 ccw(c19896.34,11455.66) 19942,11410 cw(c19983.04,11368.96) 19983.04,11427 20405.17,11427 ccw(c20405.17,11433.83) 20410,11429 v1(20410,11427) ; v1@17168.35,12050 v1@17158.59,12050 ; v1(20409.87,11183.09) 20438.67,11154.29 ccw(c20509.38,11225) 20509.38,11125 v1@21028,11125 ; v1(23577.45,10390.98) 23577.45,10976.51 cw(c23677.45,10976.51) 23606.74,11047.22 v1(23641.06,11081.54) 23698.2,11138.68 cw(c23768.91,11067.97) 23768.91,11167.97 v1(24359.86,11167.97) v1(25076.98,11168) ; R14.2@24023.12,400.26 v1(24023.12,433.12) ; v1(25744.87,10729) 25478.42,10729 ccw(c25478.42,10629) 25407.71,10699.71 25203.65,10495.65 cw(c25144.32,10554.98) v1(25144.32,10471.08) 24983.5,10471.08 ccw(c24983.5,10371.08) 24912.79,10441.79 24637.72,10166.72 ccw(c24708.43,10096.01) 24608.43,10096.01 v1(24608.43,10083.06) 24608.43,9784.86 cw(c24508.43,9784.86) 24579.14,9714.14 24492,9627 cw(c24421.96,9697.04) 24421.96,9597.99 v1(24153.46,9597.99) 24081.92,9669.52 ccw(c24011.21,9598.81) 24011.21,9698.81 v1(23613.94,9698.81) 23613.94,9245.87 ccw(c23713.94,9245.87) 23643.23,9175.16 v1(23790.63,9027.76) 23832.71,8985.67 cw(c23762,8914.96) 23862,8914.96 23862,8635.28 ccw(c23930.28,8635.28) 23882,8587 23892.67,8576.33 ccw(c23963.38,8647.04) 23963.38,8547.04 v1(24238.51,8547.04) cw(c24238.51,8480.76) 24285.37,8527.62 24307,8506 cw(c24278.03,8477.03) 24319,8477.03 24319,8146.42 ccw(c24419,8146.42) 24348.29,8075.71 24375.97,8048.03 ccw(c24446.68,8118.74) 24446.68,8018.74 v1(24637.11,8018.74) 24637.11,7643.31 ccw(c24737.11,7643.31) 24666.4,7572.6 24759,7480 ccw(c24800.47,7521.47) 24800.47,7462.82 v1(24997.03,7462.82) 24997.03,7024.39 ccw(c25097.03,7024.39) 25026.32,6953.68 25065.48,6914.52 ccw(c25136.19,6985.23) 25136.19,6885.23 v1(25328.31,6885.23) cw(c25328.31,6830.99) 25366.66,6869.34 25394,6842 25394,6484.41 cw(c25390.59,6484.41) 25393,6482 25393,6419.42 ccw(c25493,6419.42) 25422.29,6348.71 25458,6313 ccw(c25515.96,6370.96) 25515.96,6288.99 v1(25631.75,6288.99) 25662.22,6288.99 cw(c25662.22,6241.22) 25696,6275 cw(c25647.72,6226.72) 25716,6226.72 25716,5777 ccw(c25742.56,5777) 25723.78,5758.22 25790,5692 ccw(c25818.71,5720.71) 25818.71,5680.11 v1(25906.23,5680.11) 25944.71,5641.62 cw(c25874,5570.91) 25974,5570.91 25974,5280.02 ccw(c26074,5280.02) 26003.29,5209.31 v1(26155.32,5057.28) 26187.71,5024.89 cw(c26117,4954.18) 26217,4954.18 26217,4585.42 ccw(c26317,4585.42) 26246.29,4514.71 26304.48,4456.52 ccw(c26375.19,4527.23) 26375.19,4427.23 v1(26378.73,4427.23) 26520.35,4427.23 cw(c26520.35,4327.23) 26591.06,4397.94 26618.71,4370.29 cw(c26548,4299.58) 26648,4299.58 26648,3872 cw(c26602.27,3872) 26634.61,3839.66 v1(26581.8,3786.86) ; v1(26011.15,10084.43) 26124.15,10084.43 cw(c26124.15,9984.43) 26194.86,10055.14 26225.71,10024.29 cw(c26155,9953.58) 26255,9953.58 26255,9463.17 cw(c26192.04,9463.17) v1(26236.56,9418.65) 26236.56,8974.94 ccw(c26336.56,8974.94) 26265.85,8904.23 v1(26426.87,8743.21) 26472.71,8697.37 cw(c26402,8626.66) 26502,8626.66 26502,8182.15 ccw(c26602,8182.15) 26531.29,8111.44 v1(26587.51,8055.22) 26644.71,7998.02 cw(c26574,7927.31) 26674,7927.31 26674,7440.48 ccw(c26774,7440.48) 26703.29,7369.77 v1(26711.74,7361.33) 26703.29,7352.88 ccw(c26774,7282.17) 26674,7282.17 26674,6835.89 ccw(c26774,6835.89) 26703.29,6765.18 v1(26807.06,6661.41) 26807.06,6644.48 cw(c26707.06,6644.48) 26777.77,6573.77 26748.29,6544.29 ccw(c26819,6473.58) 26719,6473.58 26719,6145.06 ccw(c26819,6145.06) 26748.29,6074.35 v1(26865.3,5957.34) 26865.3,5917.08 cw(c26778.92,5917.08) 26840,5856 ccw(c26893.11,5802.89) 26818,5802.89 26818,5368.35 ccw(c26918,5368.35) 26847.29,5297.64 v1(26893.39,5251.53) 27094.71,5050.21 cw(c27024,4979.5) 27124,4979.5 27124,4561.55 cw(c27051.63,4561.55) 27118.18,4533.12 cw(c27047.88,4603.43) 27047.88,4504 26965.73,4504 cw(c26965.73,4604) 26895.02,4533.29 v1(26884.14,4544.17) ; v1(26376,796) v1(26580,796) ; R6.2@26721.12,1300.26 v1(26721.12,1332.26) 26721.12,3039.65 cw(c26821.12,3039.65) 26750.41,3110.36 v1(26779.18,3139.13) 26817,3176.95 ccw(c26746.29,3247.66) 26846.29,3247.66 v1(26846.29,3839.64) ; v1(13218.87,12139.09) 13235.62,12122.34 ccw(c13306.33,12193.05) 13306.33,12093.05 v1(13845.45,12093.05) 13929.67,12093.05 ccw(c13929.67,12193.05) 14000.38,12122.34 14006.69,12128.65 cw(c14031.69,12103.65) 14031.69,12139 14444,12139 cw(c14444,12053.48) 14504.47,12113.95 v1(14509.84,12108.58) 14609.16,12108.58 ccw(c14609.16,12208.58) 14679.87,12137.87 14683,12141 cw(c14704.73,12119.27) 14704.73,12150 15081.25,12150 cw(c15081.25,12050) 15151.96,12120.71 v1(15176.58,12096.09) 15302.18,12096.09 ccw(c15302.18,12153.82) 15343,12113 cw(c15376.8,12079.2) 15376.8,12127 15737.83,12127 cw(c15737.83,12027) 15808.54,12097.71 v1(15839.66,12066.59) 15964.87,12066.59 ccw(c15964.87,12102.13) 15990,12077 cw(c16050.36,12016.64) 16050.36,12102 16375.04,12102 cw(c16375.04,12002) 16445.76,12072.71 v1(16505.27,12013.19) 16628.25,12013.19 ccw(c16628.25,12063.75) 16664,12028 cw(c16717.11,11974.89) 16717.11,12050 v1@17158.59,12050
  other v2: 25767,1031 25807,1031 25847,1031 25887,1031 25927,1031 25967,1031 26007,1031 26047,1031 26087,1031 26127,1031 25767,1061 25807,1061 25847,1061 25887,1061 25927,1061 25967,1061 26007,1061 26047,1061 26087,1061 26127,1061 25767,1091 25807,1091 25847,1091 25887,1091 25927,1091 25967,1091 26007,1091 26047,1091 26087,1091 26127,1091 24984,1239 25024,1239 25064,1239 25104,1239 25144,1239 25184,1239 25224,1239 25264,1239 25304,1239 25344,1239 25384,1239 25424,1239 25464,1239 25504,1239 25544,1239 25584,1239 25624,1239 25664,1239 25704,1239 24984,1269 25024,1269 25064,1269 25104,1269 25144,1269 25184,1269 25224,1269 25264,1269 25304,1269 25344,1269 25384,1269 25424,1269 25464,1269 25504,1269 25544,1269 25584,1269 25624,1269 25664,1269 25704,1269 24984,1299 25024,1299 25064,1299 25104,1299 25144,1299 25184,1299 25224,1299 25264,1299 25304,1299 25344,1299 25384,1299 25424,1299 25464,1299 25504,1299 25544,1299 25584,1299 25624,1299 25664,1299 25704,1299
CC1: J3.A5 U2.1 | length 833.4
  Top Layer w8: v1(24887.12,324.26) 24887.12,144.26 24917.12,114.26 25354.12,114.26 25385.12,145.26 v1(25385.12,196.26)
  Bottom Layer w8: v1(24887.12,324.26) 24887.75,323.63 U2.1@24919.53,323.63 ; J3.A5@25384.82,242.6 25384.82,196.56 v1(25385.12,196.26)
CC2: J3.B5 U2.6 | length 482.5
  Top Layer w8: v1(24919.12,221.26) 24961.93,221.26 25035.67,295 25172.56,295 25266.56,201 v1(25267,201)
  Bottom Layer w8: v1(24919.12,221.26) 24919.53,221.67 U2.6@24919.53,244.89 ; v1@25266.71,201.29 J3.B5@25266.71,242.6
DIN: LED1_LED1.4 R8.2 | length 32250.7
  Top Layer w12: LED1_LED1.4@420.79,9088.39 423.4,9091 510,9091 524,9077 v1(524,8957) ; v1(7626,1819) 26435,1819 26579.38,1674.62 26579.38,1154.45 v1(26579.19,1154.26)
  Bottom Layer w12: v1(524,8957) 4337,8957 7379,5915 7379,1860 7420,1819 v1(7626,1819) ; v1(26579.19,1154.26) R8.2@26632.12,1154.26
DIN#: Q2.2 R5.1 U1.26 | length 114.5
  Bottom Layer w22: Q2.2@26762.49,1176.86 26762.89,1177.26 R5.1@26813.12,1177.26 26814.7,1175.68 U1.26@26814.7,1114.17
DIN_LED2: LED1_LED2.4 LED21_LED1.2 | length 957.7
  Top Layer w22: LED21_LED1.2@5793.69,13072.3 v1@5856.51,13072.3 ; v1@6558.72,13406.22 LED1_LED2.4@6621.54,13406.22
  Bottom Layer w12: v1(5856.51,13072.17) 6124.32,13339.97 cw(c6195.03,13269.26) 6195.03,13369.26 6480.21,13369.26 ccw(c6480.21,13469.26) 6550.92,13398.55 v1(6558.72,13406.35)
DIN_LED3: LED1_LED3.4 LED21_LED2.2 | length 881.6
  Top Layer w22: LED21_LED2.2@18541.27,11588.26 v1@18604.09,11588.26 ; v1@19333.72,11570.22 LED1_LED3.4@19396.54,11570.22
  Bottom Layer w12: v1(18604.09,11588.39) 18625.93,11566.55 ccw(c18696.64,11637.26) 18696.64,11537.26 19259.21,11537.26 ccw(c19259.21,11637.26) 19329.92,11566.55 v1(19333.72,11570.35)
DIN_LED4: LED1_LED4.4 LED21_LED3.2 | length 894.5
  Top Layer w22: LED21_LED3.2@25059.85,7333.03 v1@25122.67,7333.03 ; v1@25525.16,6885.36 LED1_LED4.4@25587.98,6885.36
  Bottom Layer w12: v1(25122.67,7332.9) 25122.67,7045.75 ccw(c25222.67,7045.75) 25151.96,6975.04 25175,6952 ccw(c25222.66,6999.66) 25222.66,6932.26 25436.7,6932.26 cw(c25436.7,6832.26) 25507.41,6902.97 v1(25525.16,6885.23)
DIN_LED5: LED1_LED5.4 LED21_LED4.2 | length 954.6
  Top Layer w22: LED1_LED5.4@24365.22,5206.44 v1@24428.04,5206.44 ; LED21_LED4.2@24644,4589.04 v1@24706.82,4589.04
  Bottom Layer w12: v1(24428.04,5206.58) 24565,5206.58 cw(c24565,5106.58) 24635.71,5177.29 24679.11,5133.89 cw(c24612.22,5067) 24706.82,5067 v1(24706.82,4589.18)
DIN_LED6: LED1_LED6.4 LED21_LED5.2 | length 687.9
  Top Layer w22: LED1_LED6.4@17393.89,10375.15 v1@17456.71,10375.15 ; v1@17646.16,9887.08 LED21_LED5.2@17708.98,9887.08
  Bottom Layer w12: v1(17456.71,10375.28) 17616.87,10215.12 cw(c17546.16,10144.41) 17646.16,10144.41 v1(17646.16,9887.21)
DIN_LED7: LED1_LED7.4 LED21_LED6.2 | length 718.6
  Top Layer w22: LED21_LED6.2@18652.69,8412.3 v1@18715.51,8412.3 ; LED1_LED7.4@18713.54,7840.22 v1@18776.36,7840.22
  Bottom Layer w12: v1(18715.51,8412.17) 18715.51,7942.36 ccw(c18815.51,7942.36) 18744.8,7871.65 v1(18776.36,7840.09)
DIN_LED8: LED1_LED8.4 LED21_LED7.2 | length 1073
  Top Layer w22: LED21_LED7.2@9844.89,4418.6 v1@9907.71,4418.6 ; v1@10149.72,5199.22 LED1_LED8.4@10212.54,5199.22
  Bottom Layer w12: v1(9907.71,4418.47) 9907.71,5044.29 cw(c10007.71,5044.29) 9937,5115 9947,5125 cw(c9966.31,5105.69) 9966.31,5133 10050,5133 ccw(c10050,5214.2) 10107.42,5156.78 v1(10149.72,5199.09)
  Bottom Layer w22: v1(10149.72,5199.09) v1@10149.79,5199.15
DIN_LED9: LED1_LED9.4 LED21_LED8.2 | length 750.9
  Top Layer w22: LED21_LED8.2@7786.69,10872.3 v1@7849.51,10872.3 ; v1@8208.72,10391.22 LED1_LED9.4@8271.54,10391.22
  Bottom Layer w12: v1(7849.51,10872.17) 7849.51,10791.99 ccw(c7949.51,10791.99) 7878.8,10721.27 v1(8208.72,10391.35)
DOUT1_LED1: LED1_LED1.2 LED2_LED1.4 | length 1064.3
  Top Layer w22: v1@161.12,8958.47 LED1_LED1.2@223.94,8958.47 ; v1@945.72,9366.22 LED2_LED1.4@1008.54,9366.22
  Bottom Layer w12: v1(161.12,8958.61) 189.18,8958.61 ccw(c189.18,9058.61) 259.89,8987.89 563.79,9291.79 cw(c615,9240.57) 615,9313 802.3,9313 ccw(c802.3,9384.7) 853,9334 856.06,9337.06 cw(c926.78,9266.35) 926.78,9366.35 v1(945.72,9366.35)
DOUT1_LED2: LED1_LED2.2 LED2_LED2.4 | length 951.2
  Top Layer w22: LED1_LED2.2@6424.69,13276.3 v1@6487.51,13276.3 ; v1@7197.72,13575.22 LED2_LED2.4@7260.54,13575.22
  Bottom Layer w12: v1(6487.51,13276.17) 6724.32,13512.97 cw(c6795.03,13442.26) 6795.03,13542.26 7123.21,13542.26 ccw(c7123.21,13642.26) 7193.92,13571.55 v1(7197.72,13575.35)
DOUT1_LED3: LED1_LED3.2 LED2_LED3.4 | length 874.3
  Top Layer w22: LED1_LED3.2@19199.69,11440.3 v1@19262.51,11440.3 ; v1@19973.72,11391.22 LED2_LED3.4@20036.54,11391.22
  Bottom Layer w12: v1(19262.51,11440.43) 19313.4,11389.55 ccw(c19384.11,11460.26) 19384.11,11360.26 19901.21,11360.26 ccw(c19901.21,11460.26) 19971.92,11389.55 v1(19973.72,11391.35)
DOUT1_LED4: LED1_LED4.2 LED2_LED4.4 | length 880.3
  Top Layer w22: LED1_LED4.2@25391.13,6755.44 v1@25453.95,6755.44 ; v1@25828.6,6289.12 LED2_LED4.4@25891.42,6289.12
  Bottom Layer w12: v1(25453.95,6755.31) 25453.95,6455.48 ccw(c25553.95,6455.48) 25483.23,6384.77 25504.45,6363.55 ccw(c25575.16,6434.26) 25575.16,6334.26 25742.18,6334.26 cw(c25742.18,6234.26) 25812.89,6304.97 v1(25828.6,6289.26)
DOUT1_LED5: LED1_LED5.2 LED2_LED5.4 | length 955.2
  Top Layer w22: LED2_LED5.4@23931.54,5736.22 v1@23994.36,5736.22 ; LED1_LED5.2@24168.37,5076.52 v1@24231.19,5076.52
  Bottom Layer w12: v1(23994.36,5736.35) 24090.22,5736.35 cw(c24090.22,5636.35) 24160.94,5707.06 24201.9,5666.1 cw(c24131.19,5595.39) 24231.19,5595.39 v1(24231.19,5076.65)
DOUT1_LED6: LED1_LED6.2 LED2_LED6.4 | length 676.4
  Top Layer w22: LED2_LED6.4@16872.87,10718.02 v1@16935.69,10718.02 ; v1@17134.22,10245.22 LED1_LED6.2@17197.04,10245.22
  Bottom Layer w12: v1(16935.69,10718.16) 17104.93,10548.91 cw(c17034.22,10478.2) 17134.22,10478.2 v1(17134.22,10245.36)
DOUT1_LED7: LED1_LED7.2 LED2_LED7.4 | length 680
  Top Layer w22: LED2_LED7.4@18515.54,7156.22 v1@18578.36,7156.22 ; LED1_LED7.2@18516.69,7710.3 v1@18579.51,7710.3
  Bottom Layer w12: v1(18578.36,7156.09) ccw(c18575.59,7158.86) 18579.51,7158.86 v1(18579.51,7710.17)
DOUT1_LED8: LED1_LED8.2 LED2_LED8.4 | length 1045.9
  Top Layer w22: LED1_LED8.2@10015.69,5069.3 v1@10078.51,5069.3 ; v1@10342.72,5846.22 LED2_LED8.4@10405.54,5846.22
  Bottom Layer w12: v1(10078.51,5069.17) 10174.83,5165.48 ccw(c10104.12,5236.19) 10204.12,5236.19 10204.12,5757 cw(c10264.02,5757) 10221.66,5799.35 10257.77,5835.46 cw(c10302.63,5746.09) 10302.63,5846.09 v1(10342.72,5846.09)
DOUT1_LED9: LED1_LED9.2 LED2_LED9.4 | length 621.4
  Top Layer w12: LED2_LED9.4@7539.54,10490.22 7654.36,10490.22 cw(c7654.36,10390.22) 7725.07,10460.93 7895.41,10290.59 ccw(c7966.12,10361.3) 7959.88,10261.49 ccw(c7966.12,10361.3) 7966.12,10261.3 LED1_LED9.2@8074.69,10261.3
DOUT2_LED1: LED2_LED1.2 LED3_LED1.4 | length 953.9
  Top Layer w22: LED2_LED1.2@811.69,9236.3 v1@874.51,9236.3 ; v1@1554.93,9614.28 LED3_LED1.4@1617.75,9614.28
  Bottom Layer w12: v1(874.51,9236.43) 1180.79,9542.71 cw(c1251.5,9472) 1251.5,9572 1471.36,9572 ccw(c1471.36,9672) 1542.08,9601.29 v1(1554.93,9614.14)
DOUT2_LED2: LED2_LED2.2 LED3_LED2.4 | length 945.1
  Top Layer w22: LED2_LED2.2@7063.69,13445.3 v1@7126.51,13445.3 ; v1@7847.72,13703.22 LED3_LED2.4@7910.54,13703.22
  Bottom Layer w12: v1(7126.51,13445.17) 7321.32,13639.97 cw(c7392.03,13569.26) 7392.03,13669.26 7772.47,13669.26 ccw(c7772.47,13769.26) 7843.19,13698.55 v1(7847.72,13703.09)
DOUT2_LED3: LED2_LED3.2 LED3_LED3.4 | length 853.7
  Top Layer w22: LED2_LED3.2@19839.69,11261.3 v1@19902.51,11261.3 ; v1@20606.72,11183.22 LED3_LED3.4@20669.54,11183.22
  Bottom Layer w12: v1(19902.51,11261.43) ccw(c19971.16,11330.08) 19971.16,11233 20515.66,11233 cw(c20515.66,11133) 20567.21,11218.69 cw(c20515.66,11133) 20586.37,11203.71 v1(20606.72,11183.35)
DOUT2_LED4: LED2_LED4.2 LED3_LED4.4 | length 877.5
  Top Layer w22: LED2_LED4.2@25694.57,6159.2 v1@25757.39,6159.2 ; v1@26103.08,5680.24 LED3_LED4.4@26165.9,5680.24
  Bottom Layer w12: v1(25757.39,6159.34) 25757.39,5830.03 ccw(c25857.39,5830.03) 25760.64,5804.74 ccw(c25857.39,5830.03) 25786.68,5759.32 25817,5729 ccw(c25831.49,5743.49) 25831.49,5723 26018.76,5723 cw(c26018.76,5623) 26089.47,5693.71 v1(26103.08,5680.11)